# Altium PCB HALL_CURRENT_SENSE_LEM_55P.PcbDoc
Units mil, origin at the board's own origin, x right, y up, seen from the top; angles counter-clockwise.
Board outline 3937.01 x 3937.01 mil, 2 copper layers (Top Layer, Bottom Layer); 42 components, 22 nets, 124 pads, 104 vias.
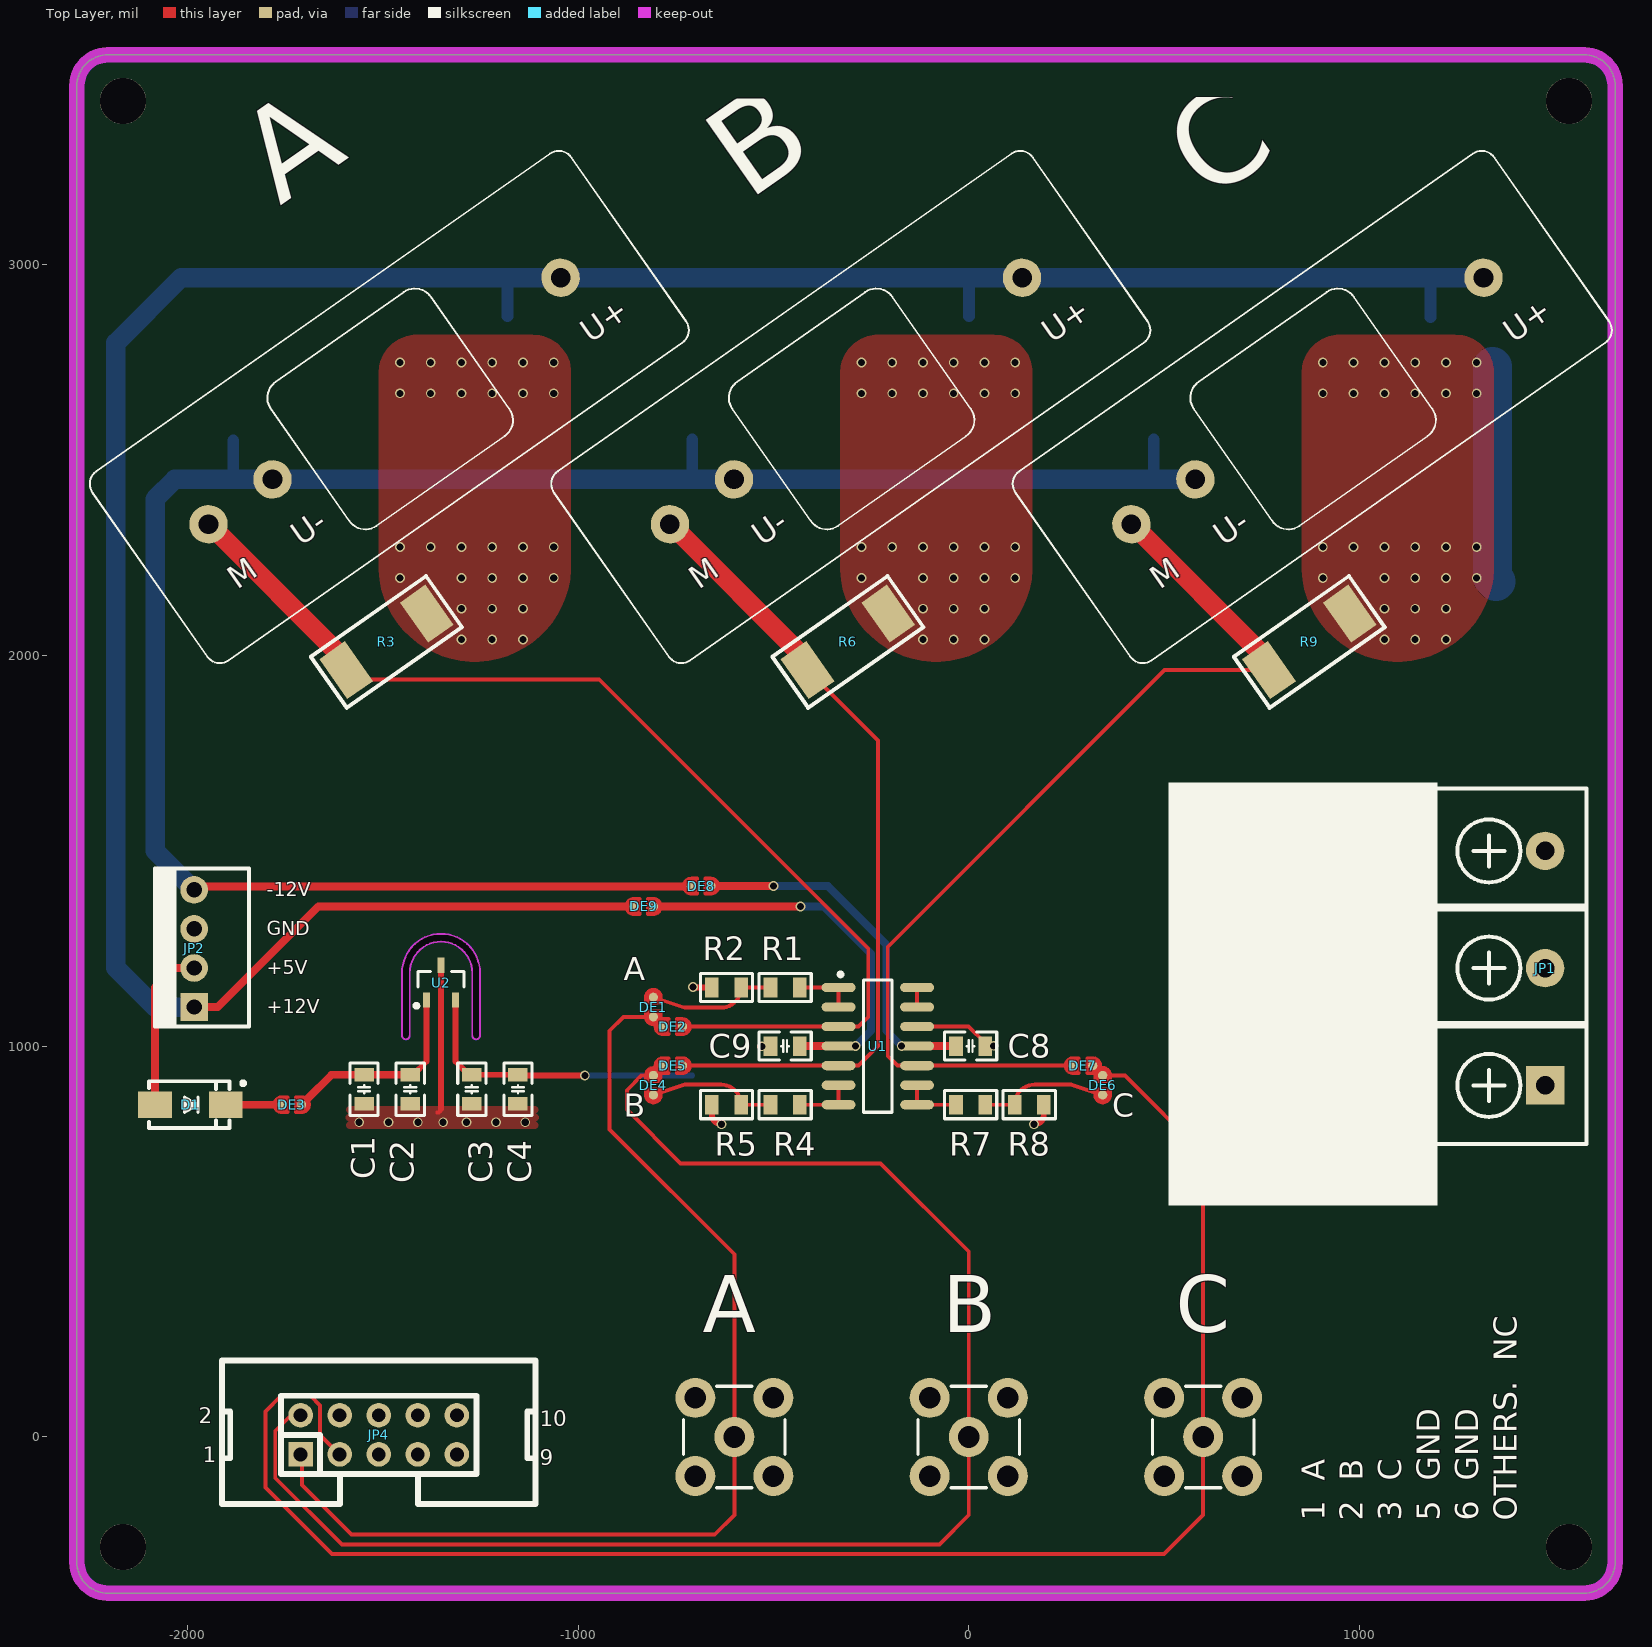
[diagram p0: Top Layer view]
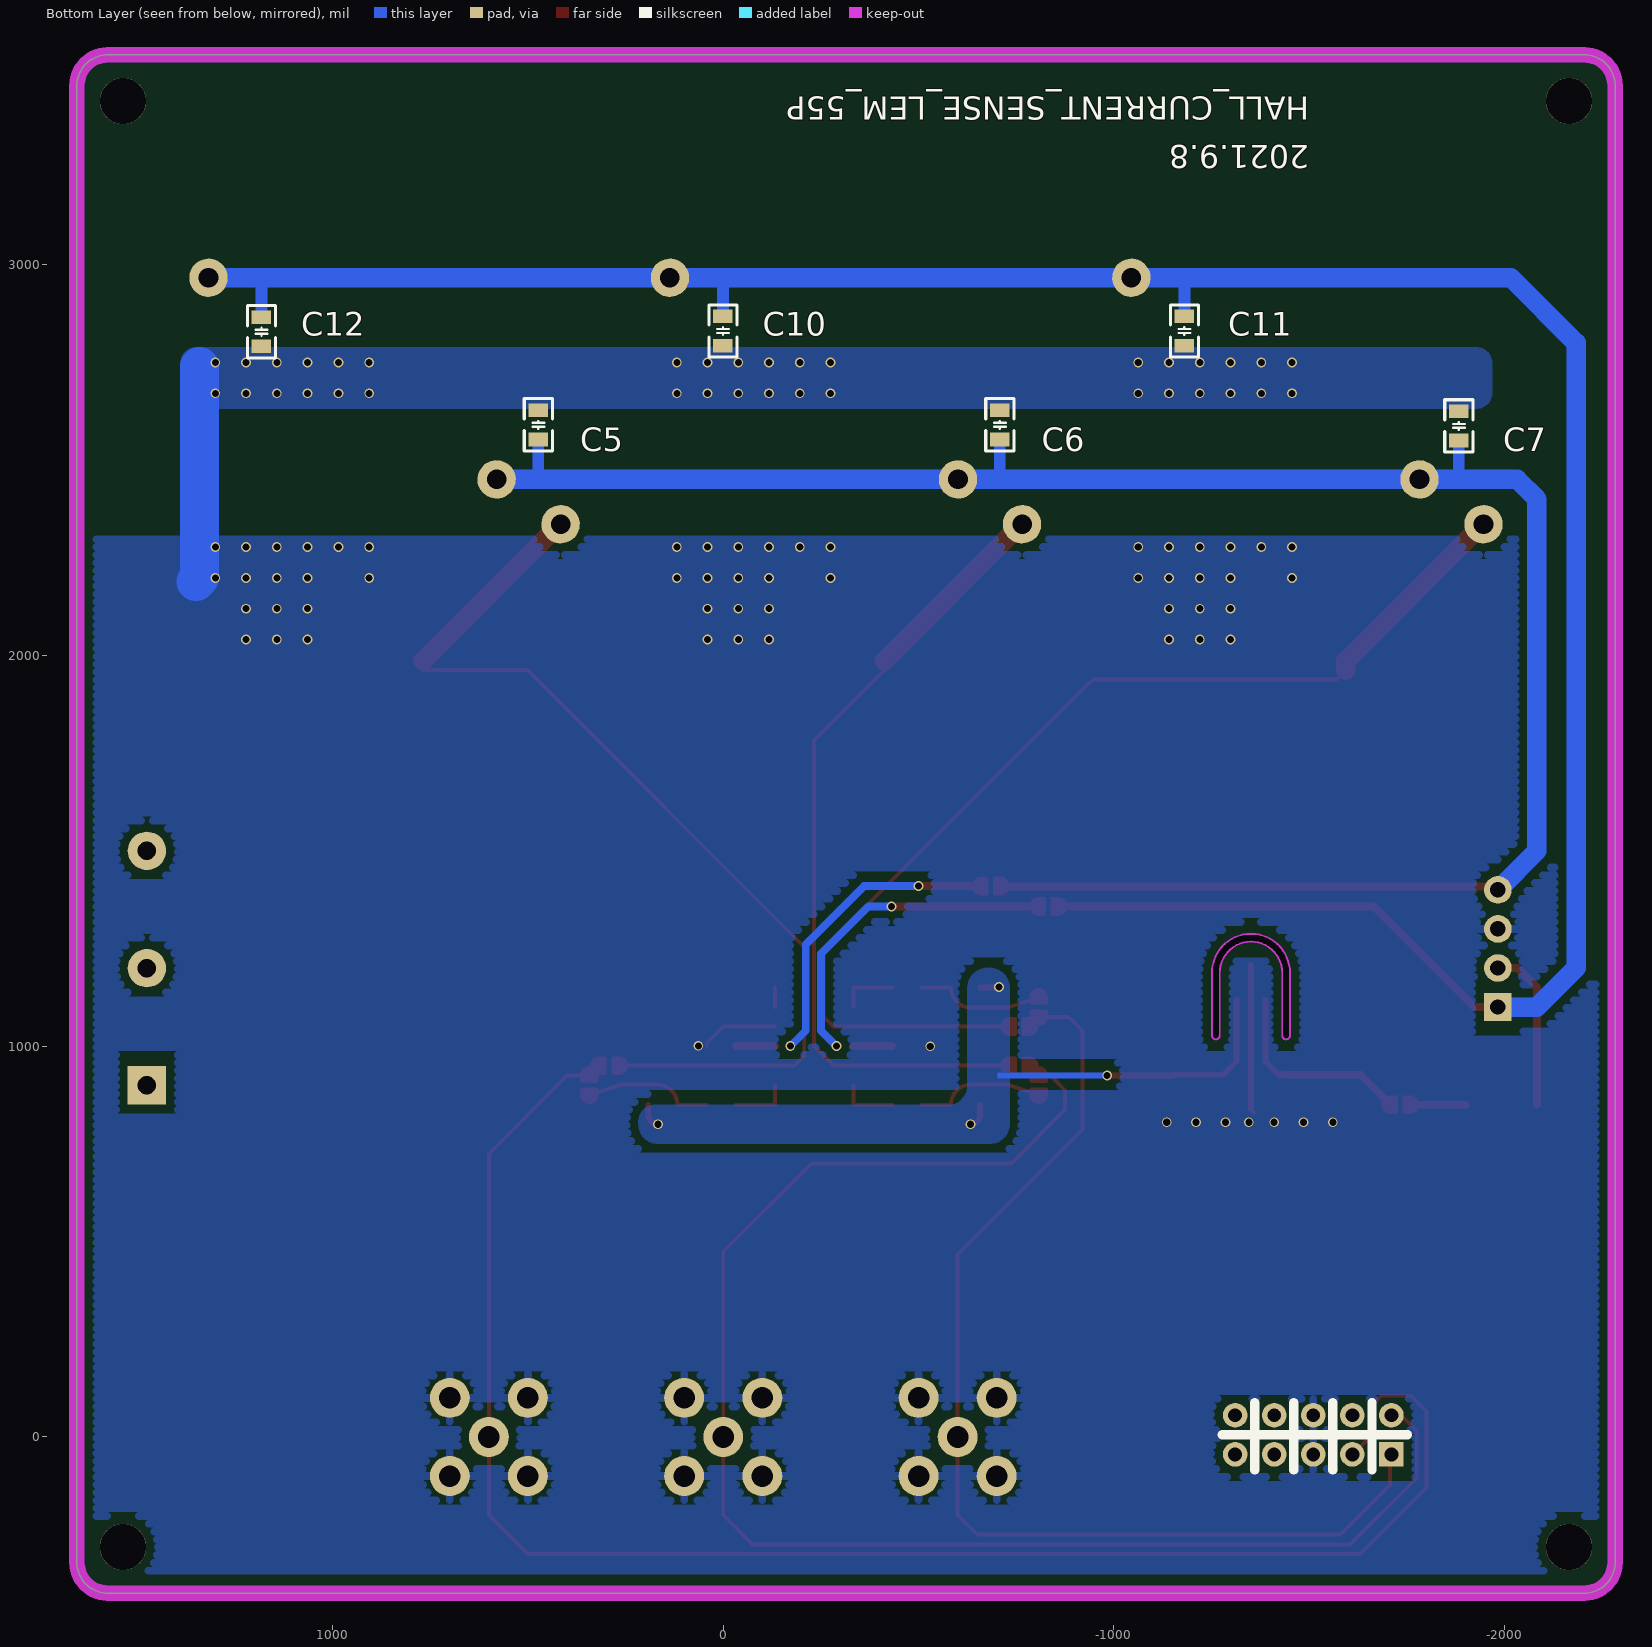
[diagram p1: Bottom Layer view, seen from below]

## Layer stack, top to bottom
Top Solder: solder mask 0.4, Solder Resist, Dk 3.5
Top Layer: signal copper 1.4
Dielectric 1: dielectric 12.6, FR-4, Dk 4.8
Bottom Layer: signal copper 1.4
Bottom Solder: solder mask 0.4, Solder Resist, Dk 3.5

## Board outline
-2282.68,-320.87 -2282.68,3458.66 cw(c-2203.94,3458.66) -2203.94,3537.4 1575.59,3537.4 cw(c1575.59,3458.66) 1654.33,3458.66 1654.33,-320.87 cw(c1575.59,-320.87) 1575.59,-399.61 -2203.94,-399.61 cw(c-2203.94,-320.87)
cut-out: -1440.71,1017.8 cw(c-1440.71,1027.8) -1450.71,1027.8 -1450.71,1187.8 cw(c-1350.71,1187.8) -1350.71,1287.8 cw(c-1350.71,1187.8) -1250.71,1187.8 -1250.71,1027.8 cw(c-1260.71,1027.8) -1260.71,1017.8 cw(c-1260.71,1027.8) -1270.71,1027.8 -1270.71,1187.8 ccw(c-1350.71,1187.8) -1350.71,1267.8 ccw(c-1350.71,1187.8) -1430.71,1187.8 -1430.71,1027.8 cw(c-1440.71,1027.8)

## Design rules (kind name [scope] priority, off if disabled: settings)
Clearance [All] p1: gap=20 ignorepadtopadclearanceinfootprint=FALSE except(0: Arc-Hole Track-Hole SMDPad-Hole THPad-Hole Via-Hole Text-Hole; 10: Arc-Arc Arc-Track Arc-SMDPad Arc-THPad Arc-Via Arc-Text Track-Track Track-SMDPad Track-THPad Track-Via Track-Text SMDPad-SMDPad SMDPad-THPad SMDPad-Via SMDPad-Text THPad-THPad THPad-Via THPad-Text Via-Via Via-Text Text-Text)
MinimumSolderMaskSliver [All] p1 off: minsoldermaskwidth=10
PolygonConnect [All] p1: thpad.connectstyle=Relief thpad.reliefconductorwidth=20 thpad.reliefentries=4 thpad.polygonreliefangle="90 Angle" thpad.airgapwidth=10 smdpad.connectstyle=Direct smdpad.reliefconductorwidth=10 smdpad.reliefentries=4 smdpad.polygonreliefangle="90 Angle" smdpad.airgapwidth=10 via.connectstyle=Direct via.reliefconductorwidth=10 via.reliefentries=4 via.polygonreliefangle="90 Angle" via.airgapwidth=10
RoutingVias [All] p1: holewidth=28 width=50 viastyle="Through Hole" minholewidth=28 minwidth=50 maxholewidth=28 maxwidth=50
SilkToSolderMaskClearance [IsPad] p1 off: minsilkscreentomaskgap=10 clearancetoexposedcopper=TRUE
SolderMaskExpansion [All] p1: expansion=4 istentingtop=FALSE
Width [All] p1: maxlimit=100 minlimit=8 preferedwidth=10
28 further rules are at their usual default settings.

## Classes and differential pairs
component class HALL_CURRENT_SENSE_LEM_55P: A B C C1 C2 C3 C4 C5 C6 C7 C8 C9 C10 C11 C12 D1 DE1 DE2 DE3 DE4 DE5 DE6 DE7 DE8 DE9 JP1 JP2 JP4 R1 R2 R3 R4 R5 R6 R7 R8 R9 U1 U2

## Components (designator, comment, footprint, x,y, rotation, side; value= is the part's Value field where it differs from the comment)
A "SMA WIFI 天线接口" SMA-KE-LI -600,0 r180 top (schematic designator JP1)
A "LA 55-P" "LA 55-P" -1495.28,2651.57 r35 top (schematic designator HALL1)
B "SMA WIFI 天线接口" SMA-KE-LI 0,0 r180 top (schematic designator JP3)
B "LA 55-P" "LA 55-P" -314.17,2651.57 r35 top (schematic designator HALL2)
C "SMA WIFI 天线接口" SMA-KE-LI 600,0 r180 top (schematic designator JP5)
C "LA 55-P" "LA 55-P" 866.93,2651.57 r35 top (schematic designator HALL3)
C1 "475" "C 0805_L" -1429.45,889.89 r90 top
C2 "104" "C 0805_L" -1547.56,889.89 r90 top
C3 "475" "C 0805_L" -1271.97,889.89 r90 top
C4 "104" "C 0805_L" -1153.86,889.89 r90 top
C5 "475" "C 0805_L" 473.23,2590.55 r270 bottom
C6 "475" "C 0805_L" -707.88,2590.55 r270 bottom
C7 "475" "C 0805_L" -1882.68,2587.79 r270 bottom
C8 "104" "C 0805_L" 4.72,1000.39 r180 top
C9 "104" "C 0805_L" -470.08,1000.4 r0 top
C10 "475" "C 0805_L" 0.79,2830.71 r90 bottom
C11 "475" "C 0805_L" -1180.31,2830.71 r90 bottom
C12 "475" "C 0805_L" 1181.89,2828.74 r90 bottom
D1 "SS34" SMA -1992.13,850.39 r0 top
DE1 "DEBUG PAD" DEBUG_B#1 -807.2,1100.39 r90 top
DE2 "DEBUG PAD" DEBUG_B#2 -757.68,1050.39 r180 top
DE3 "DEBUG PAD" DEBUG_B#3 -1732.68,850.39 r0 top
DE4 "DEBUG PAD" DEBUG_B#4 -807.2,900.39 r270 top
DE5 "DEBUG PAD" DEBUG_B#5 -757.68,950.39 r180 top
DE6 "DEBUG PAD" DEBUG_B#6 342.8,900.39 r270 top
DE7 "DEBUG PAD" DEBUG_B#5 292.32,950.39 r0 top
DE8 "DEBUG PAD" DEBUG_B#3 -685,1410 r0 top
DE9 "DEBUG PAD" DEBUG_B#3 -832.2,1357.8 r0 top
JP1 "HDR-1X3" KF7620-3P 1331.3,1200 r90 top
JP2 "HDR-1X4" KF2510-LI-4P -1982.68,1250.39 r90 top
JP4 "Header 5X2" IDC2.54-LI-2x5P -1710.16,-44.49 r0 top
R1 "10K" "R 0805_L" -470.08,1150.4 r0 top
R2 "10K" "R 0805_L" -620.08,1150.4 r0 top
R3 "100" "R 2512_M" -1490.5,2034.85 r35 top
R4 "10K" "R 0805_L" -470.08,850.4 r0 top
R5 "10K" "R 0805_L" -620.08,850.4 r0 top
R6 "100" "R 2512_M" -309.4,2034.85 r35 top
R7 "10K" "R 0805_L" 4.72,850.39 r180 top
R8 "10K" "R 0805_L" 154.72,850.39 r180 top
R9 "100" "R 2512_M" 871.7,2034.85 r35 top
U1 "LM324" SOIC-14 -232.68,1000.39 r0 top
U2 "REF3030" SOT23-3L -1350.71,1163.5 r0 top

## Footprints (in the part's own frame and the unit in brackets; to place one, negate y for a bottom-side part, rotate by r counter-clockwise, add the part's x,y. Pads: shape width x height; smd on the part's side, far side on the other; paste and mask are expansions set on the pad)
"C 0805_L" [mil] "无极性贴片电容"
  rect 35x50 smd: 1(-37.4,0) 2(37.4,0)
  silkscreen extent -67,-36 67,36, body extent -39,-24 39,24, height 20
DEBUG_B#1 [mm] "调试断点焊盘"
  round 0.6 smd paste-0.6: 1(-0.635,0) 2(0.635,0)
  Top Layer region: 0.254,-0.508 0.762,-0.508 0.908,-0.479 1.031,-0.396 1.114,-0.273 1.143,-0.127 1.143,-0.127 1.143,0 1.104,0.194 0.994,0.359 0.829,0.469 0.635,0.508 0.635,0.508 0.254,0.508
  Top Layer region: -0.254,0.508 -0.762,0.508 -0.908,0.479 -1.031,0.396 -1.114,0.273 -1.143,0.127 -1.143,0.127 -1.143,0 -1.104,-0.194 -0.994,-0.359 -0.829,-0.469 -0.635,-0.508 -0.635,-0.508 -0.254,-0.508
  Top Layer lines w0.203: -0.635,0.508 ccw(c-0.635,0) -1.124,-0.136 ccw(c-0.635,0) -0.781,-0.487 ccw(c-0.635,0) -0.635,-0.508 -0.254,-0.508 -0.254,0.508 -0.635,0.508 ; 0.254,0.508 0.254,-0.508 0.635,-0.508 ccw(c0.635,0) 0.635,0.508 0.254,0.508
DEBUG_B#2 [mm] "调试断点焊盘"
  round 0.6 smd paste-0.6: 1(-0.635,0) 2(0.635,0)
  Top Layer region: 0.254,-0.508 0.762,-0.508 0.908,-0.479 1.031,-0.396 1.114,-0.273 1.143,-0.127 1.143,-0.127 1.143,0 1.104,0.194 0.994,0.359 0.829,0.469 0.635,0.508 0.635,0.508 0.254,0.508
  Top Layer region: -0.254,0.508 -0.762,0.508 -0.908,0.479 -1.031,0.396 -1.114,0.273 -1.143,0.127 -1.143,0.127 -1.143,0 -1.104,-0.194 -0.994,-0.359 -0.829,-0.469 -0.635,-0.508 -0.635,-0.508 -0.254,-0.508
  Top Layer lines w0.203: 1.122,-0.146 ccw(c0.635,0) 0.635,0.508 0.254,0.508 0.254,-0.508 0.635,-0.508 ccw(c0.635,0) 0.771,-0.489 ccw(c0.635,0) 1.122,-0.146 ; -0.254,0.508 -0.635,0.508 ccw(c-0.635,0) -1.143,0 ccw(c-0.635,0) -0.635,-0.508 -0.254,-0.508 -0.254,0.508
DEBUG_B#3 [mm] "调试断点焊盘"
  round 0.6 smd paste-0.6: 1(-0.635,0) 2(0.635,0)
  Top Layer region: 0.254,-0.508 0.762,-0.508 0.908,-0.479 1.031,-0.396 1.114,-0.273 1.143,-0.127 1.143,-0.127 1.143,0 1.104,0.194 0.994,0.359 0.829,0.469 0.635,0.508 0.635,0.508 0.254,0.508
  Top Layer region: -0.254,0.508 -0.762,0.508 -0.908,0.479 -1.031,0.396 -1.114,0.273 -1.143,0.127 -1.143,0.127 -1.143,0 -1.104,-0.194 -0.994,-0.359 -0.829,-0.469 -0.635,-0.508 -0.635,-0.508 -0.254,-0.508
  Top Layer lines w0.203: -1.143,0 ccw(c-0.635,0) -0.635,-0.508 -0.254,-0.508 -0.254,0 -0.254,0.508 -0.635,0.508 ccw(c-0.635,0) -1.143,0 ; 0.254,-0.508 0.254,0 0.254,0.508 0.635,0.508 cw(c0.635,0) 0.994,0.359 cw(c0.635,0) 0.635,-0.508 0.254,-0.508
DEBUG_B#4 [mm] "调试断点焊盘"
  round 0.6 smd paste-0.6: 1(-0.635,0) 2(0.635,0)
  Top Layer region: 0.254,-0.508 0.762,-0.508 0.908,-0.479 1.031,-0.396 1.114,-0.273 1.143,-0.127 1.143,-0.127 1.143,0 1.104,0.194 0.994,0.359 0.829,0.469 0.635,0.508 0.635,0.508 0.254,0.508
  Top Layer region: -0.254,0.508 -0.762,0.508 -0.908,0.479 -1.031,0.396 -1.114,0.273 -1.143,0.127 -1.143,0.127 -1.143,0 -1.104,-0.194 -0.994,-0.359 -0.829,-0.469 -0.635,-0.508 -0.635,-0.508 -0.254,-0.508
  Top Layer lines w0.203: 0.635,-0.508 ccw(c0.635,0) 0.635,0.508 0.254,0.508 0.254,-0.508 0.635,-0.508 ; -0.254,-0.508 -0.254,0 -0.254,0.508 -0.635,0.508 ccw(c-0.635,0) -0.781,0.487 ccw(c-0.635,0) -1.124,0.136 ccw(c-0.635,0) -0.635,-0.508 -0.254,-0.508
DEBUG_B#5 [mm] "调试断点焊盘"
  round 0.6 smd paste-0.6: 1(-0.635,0) 2(0.635,0)
  Top Layer region: 0.254,-0.508 0.762,-0.508 0.908,-0.479 1.031,-0.396 1.114,-0.273 1.143,-0.127 1.143,-0.127 1.143,0 1.104,0.194 0.994,0.359 0.829,0.469 0.635,0.508 0.635,0.508 0.254,0.508
  Top Layer region: -0.254,0.508 -0.762,0.508 -0.908,0.479 -1.031,0.396 -1.114,0.273 -1.143,0.127 -1.143,0.127 -1.143,0 -1.104,-0.194 -0.994,-0.359 -0.829,-0.469 -0.635,-0.508 -0.635,-0.508 -0.254,-0.508
  Top Layer lines w0.203: 1.122,0.146 ccw(c0.635,0) 0.771,0.489 ccw(c0.635,0) 0.635,0.508 0.254,0.508 0.254,0 0.254,-0.508 0.635,-0.508 ccw(c0.635,0) 1.122,0.146 ; -0.254,0.508 -0.635,0.508 ccw(c-0.635,0) -1.143,0 ccw(c-0.635,0) -0.635,-0.508 -0.254,-0.508 -0.254,0.508
DEBUG_B#6 [mm] "调试断点焊盘"
  round 0.6 smd paste-0.6: 1(-0.635,0) 2(0.635,0)
  Top Layer region: 0.254,-0.508 0.762,-0.508 0.908,-0.479 1.031,-0.396 1.114,-0.273 1.143,-0.127 1.143,-0.127 1.143,0 1.104,0.194 0.994,0.359 0.829,0.469 0.635,0.508 0.635,0.508 0.254,0.508
  Top Layer region: -0.254,0.508 -0.762,0.508 -0.908,0.479 -1.031,0.396 -1.114,0.273 -1.143,0.127 -1.143,0.127 -1.143,0 -1.104,-0.194 -0.994,-0.359 -0.829,-0.469 -0.635,-0.508 -0.635,-0.508 -0.254,-0.508
  Top Layer lines w0.203: 0.635,-0.508 ccw(c0.635,0) 0.635,0.508 0.254,0.508 0.254,0 0.254,-0.508 0.469,-0.508 0.635,-0.508 ; -0.254,-0.508 -0.254,0 -0.254,0.508 -0.635,0.508 ccw(c-0.635,0) -1.116,-0.163 ccw(c-0.635,0) -0.789,-0.484 ccw(c-0.635,0) -0.635,-0.508 -0.254,-0.508
IDC2.54-LI-2x5P [mm] "10P简易牛角座"
  rect 1.6x1.6 hole 0.9: 1(0,0)
  round 1.6 hole 0.9: 2(0,2.54) 3(2.54,0) 4(2.54,2.54) 5(5.08,0) 6(5.08,2.54) 7(7.62,0) 8(7.62,2.54) 9(10.16,0) 10(10.16,2.54)
  silkscreen extent -5.11,-3.23 15.27,6.1, body extent -5.08,-3.08 15.24,5.77, height 9.17
KF2510-LI-4P [mm] "接插件/2A"
  rect 1.8x1.8 hole 1: 1(-3.81,0)
  round 1.8 hole 1: 2(-1.27,0) 3(1.27,0) 4(3.81,0)
  silkscreen extent -5.08,-3.56 5.21,2.54, body extent -5.08,-3.5 5.08,2.4, height 11.05
KF7620-3P [mm] "22.8*12*12mm(长宽高)"
  rect 2.5x2.5 hole 1.2: 1(-7.62,-3.65)
  round 2.5 hole 1.2: 2(0,-3.65) 3(7.62,-3.65)
  silkscreen extent -11.43,-6.35 11.68,6.35, body extent -11.43,-6.2 12.13,6.2, height 12.45
"LA 55-P" [mm] "LEM 莱姆闭环霍尔电流传感器"
  round 2.5 hole 1.27: 1(-13.97,0) 2(-8.89,0) 3(13.97,0)
  silkscreen extent -18.97,-8 19.03,7
"R 0805_L" [mil] "1/8W贴片电阻   https://item.taobao.com/item.htm?ft=t&id=613637044352"
  rect 35x50 smd: 1(-37.4,0) 2(37.4,0)
  silkscreen extent -67,-36 67,36, body extent -39,-25 39,25, height 20
"R 2512_M" [mm] "1W贴片电阻"
  rect 2.032x3.2 smd: 1(-3.2,0) 2(3.2,0)
  silkscreen extent -4.57,-2.03 4.57,2.03, body extent -3.2,-1.6 3.2,1.6, height 0.55
SMA [mm] "4.5x2.6*2.2mm（长宽高，不包括引脚）"
  rect 2.2x1.75 smd: 1(-2.3,0) 2(2.3,0)
  silkscreen extent -2.7,-1.52 3.56,1.52, body extent -2.53,-1.3 2.58,1.3, height 2.15
SMA-KE-LI [mm] "SMA 立式直插射频天线座"
  round 2.6 hole 1.4: 1(0,0) 2(-2.54,-2.54) 2(2.54,-2.54) 3(-2.54,2.54) 3(2.54,2.54)
  silkscreen extent -3.3,-3.3 3.3,3.3, body extent -3.25,-3.25 3.25,3.25, height 10.35
SOIC-14 [mm] "SOP, 14-Leads,"
  oval 2.2x0.6 smd: 1(-2.552,3.81) 2(-2.552,2.54) 3(-2.552,1.27) 4(-2.552,0) 5(-2.552,-1.27) 6(-2.552,-2.54) 7(-2.552,-3.81) 8(2.552,-3.81) 9(2.552,-2.54) 10(2.552,-1.27) 11(2.552,0) 12(2.552,1.27) 13(2.552,2.54) 14(2.552,3.81)
  silkscreen extent -2.55,-4.3 0.93,4.78, body extent -3,-4.35 2.99,4.35, height 1.55
SOT23-3L [mm] "3x1.3x1mm(长宽高)"
  rect 0.45x1 smd: 1(-0.95,-1.143) 2(0.95,-1.143) 3(0,1.125)
  silkscreen extent -1.72,-1.65 1.5,0.7, body extent -1.5,-1.2 1.5,1.2, height 1.05

## Part data
A B C: library part "SMA WIFI", "SMA-2.4G射频天线接口", BOM名称=SMA-2.4G射频天线接口, 下单链接=https://item.taobao.com/item.htm?ft=t&id=613637044352, 淘宝ID=小糖豆的小窝窝
A B C: "LEM 莱姆闭环霍尔电流传感器"
C1 C2 C3 C4 C5 C6 C7 C8 C9 C10 C11 C12: library part C, "贴片电容", BOM名称=贴片电容, 下单链接=https://item.taobao.com/item.htm?ft=t&id=613637044352, 淘宝ID=小糖豆的小窝窝
D1: library part 1N4007, "整流二极管", BOM名称=整流二极管, 下单链接=https://item.taobao.com/item.htm?ft=t&id=613637044352, 淘宝ID=小糖豆的小窝窝
DE1 DE2 DE3 DE4 DE5 DE6 DE7 DE8 DE9: library part DEBUG, "调试断点焊盘", BOM名称=调试断点焊盘, 下单链接=https://item.taobao.com/item.htm?ft=t&id=613637044352, 淘宝ID=小糖豆的小窝窝
JP1: library part "Header 3", "3P接插件", BOM名称=3P接插件, 下单链接=https://item.taobao.com/item.htm?ft=t&id=613637044352, 淘宝ID=小糖豆的小窝窝
JP2: library part "Header 4", "4P接插件", BOM名称=4P接插件, 下单链接=https://item.taobao.com/item.htm?ft=t&id=613637044352, 淘宝ID=小糖豆的小窝窝
JP4: "5*2P接插件", BOM名称=5*2P接插件, 下单链接=https://item.taobao.com/item.htm?ft=t&id=613637044352, 淘宝ID=小糖豆的小窝窝
R1 R2 R3 R4 R5 R6 R7 R8 R9: library part R, "贴片电阻", BOM名称=贴片电阻, 下单链接=https://item.taobao.com/item.htm?ft=t&id=613637044352, 淘宝ID=小糖豆的小窝窝
U1: "4路运放", Alias1=https://item.taobao.com/item.htm?ft=t&id=613637044352, BOM名称=4路运放, 淘宝ID=小糖豆的小窝窝

## Free pads (board coordinates)
  round 118.11 hole 118.11: Q(-2164.57,-281.5) Q(-2164.57,3419.29) Q(1536.22,-281.5) Q(1536.22,3419.29)

## Via types
v1: diameter 25, hole 18, Top Layer to Bottom Layer, 104 vias

## Nets (pads, with @x,y where several pads share a name; then routed paths per layer and width w, separated by ;. In a path a pad name is that pad's centre, name@x,y a point inside that pad or via, vN(x,y) a via of type N, cw(c..) or ccw(c..) an arc to the next point about the centre after c; other vN are vias at no path point)
+5: D1.1 JP2.2 | length 420.7
  Top Layer w20: D1.1 -2082.68,1150.39 -2032.68,1200.39 JP2.2
+12: A.3@-1044.74,2967.04 B.3@136.36,2967.04 C10.2 C11.2 C12.2 C.3@1317.46,2967.04 DE9.1 JP2.1 | length 6942.7
  Top Layer w20: JP2.1 -1921.97,1100.39 -1664.57,1357.8 -877.2,1357.8 DE9.1
  Bottom Layer w30: C11.2 -1180.32,2966.73 -1180,2967.04 ; 0,2967.04 0.79,2966.25 C10.2 ; 1180,2967.04 1181.89,2965.16 C12.2
  Bottom Layer w50: JP2.1 -2082.68,1100.39 -2182.68,1200.39 -2182.68,2800.39 -2016.03,2967.04 -1180,2967.04 -1044.74,2967.04 0,2967.04 136.36,2967.04 1180,2967.04 C.3@1317.46,2967.04
-12: A.2@-1781.98,2450.82 B.2@-600.88,2450.82 C5.2 C6.2 C7.2 C.2@580.23,2450.82 DE8.1 JP2.4 | length 5331.9
  Top Layer w20: JP2.4@-1972.68,1397.8 -1976.38,1394.09 JP2.4 -1973.76,1409.31 -729.99,1409.31 -710.69,1409.31 DE8.1
  Bottom Layer w20: JP2.4 JP2.4@-1978.6,1400.39
  Bottom Layer w30: -1890,2450.82 -1882.68,2458.15 C7.2 ; C6.2 -707.87,2458.7 -700,2450.82 ; 470,2450.82 473.23,2454.05 C5.2
  Bottom Layer w50: JP2.4 -2082.68,1500.39 -2082.68,2400.39 -2032.25,2450.82 -1890,2450.82 -1781.98,2450.82 -700,2450.82 -600.88,2450.82 470,2450.82 C.2@580.23,2450.82
GND: A.2@-500,100 A.2@-700,100 A.3@-500,-100 A.3@-700,-100 B.2@100,100 B.2@-100,100 B.3@100,-100 B.3@-100,-100 C1.1 C2.1 C3.1 C4.1 C5.1 C6.1 C7.1 C8.1 C9.1 C10.1 C11.1 C12.1 C.2@500,100 C.2@700,100 C.3@500,-100 C.3@700,-100 JP2.3 JP4.5 JP4.6 R3.2 R6.2 R9.2 U1.12 U2.3 | length 1136.3
  Top Layer w10: -1360.16,830.51 ccw(c-1360.16,839.96) -1350.71,839.96 ; U1.12 -0.37,1050.39 42.13,1007.89 C8.1
  Top Layer w15: -1350.71,839.96 U2.3
  Bottom Layer w100: 1340,2740 1340,2200 1350,2190
  other v1: -1560.16,805.51 -1485.16,805.51 -1410.16,805.51 -1345.16,805.51 -1285.16,805.51 -1210.16,805.51 -1135.16,805.51 -529.81,1000 63.75,1001.07 -1298.43,2041.34 -1219.68,2041.34 -1140.94,2041.34 -117.32,2041.34 -38.58,2041.34 40.16,2041.34 1063.78,2041.34 1142.52,2041.34 1221.26,2041.34 -1298.43,2120.08 -1219.68,2120.08 -1140.94,2120.08 -117.32,2120.08 -38.58,2120.08 40.16,2120.08 1063.78,2120.08 1142.52,2120.08 1221.26,2120.08 -1455.91,2198.82 -1298.43,2198.82 -1219.68,2198.82 -1140.94,2198.82 -1062.2,2198.82 -274.8,2198.82 -117.32,2198.82 -38.58,2198.82 40.16,2198.82 118.9,2198.82 906.3,2198.82 1063.78,2198.82 1142.52,2198.82 1221.26,2198.82 1300,2198.82 -1455.91,2277.56 -1377.17,2277.56 -1298.43,2277.56 -1219.68,2277.56 -1140.94,2277.56 -1062.2,2277.56 -274.8,2277.56 -196.06,2277.56 -117.32,2277.56 -38.58,2277.56 40.16,2277.56 118.9,2277.56 906.3,2277.56 985.04,2277.56 1063.78,2277.56 1142.52,2277.56 1221.26,2277.56 1300,2277.56 -1455.91,2671.26 -1377.17,2671.26 -1298.43,2671.26 -1219.69,2671.26 -1140.94,2671.26 -1062.2,2671.26 -274.8,2671.26 -196.06,2671.26 -117.32,2671.26 -38.58,2671.26 40.16,2671.26 118.9,2671.26 906.3,2671.26 985.04,2671.26 1063.78,2671.26 1142.52,2671.26 1221.26,2671.26 1300,2671.26 -1455.91,2750 -1377.17,2750 -1298.43,2750 -1219.69,2750 -1140.94,2750 -1062.2,2750 -274.8,2750 -196.06,2750 -117.32,2750 -38.58,2750 40.16,2750 118.9,2750 906.3,2750 985.04,2750 1063.78,2750 1142.52,2750 1221.26,2750 1300,2750
IA: A.1@-600,0 DE1.1 DE2.2 JP4.1 | length 2759.2
  Top Layer w10: JP4.1 -1707.01,-47.64 -1707.01,-122.64 -1579.65,-250 -650,-250 -600,-200 -600,0 -600,467.72 -919.61,787.32 -919.61,1039.76 -883.98,1075.39 -827.2,1075.39 DE1.1
IB: B.1@0,0 DE4.1 DE5.2 JP4.2 | length 3911.8
  Top Layer w10: JP4.2 -1735.16,55.51 -1775,15.67 -1775,-104.65 -1604.65,-275 -75,-275 0,-200 0,0 0,475 -225.39,700.39 -737.72,700.39 -875,837.68 -875,887.52 -837.13,925.39 -827.2,925.39 DE4.1
IC: C.1@600,0 DE6.1 DE7.2 JP4.3 | length 4284.9
  Top Layer w10: JP4.3 -1660.16,5.51 -1660.16,80.51 -1685.16,105.51 -1760.16,105.51 -1800,65.67 -1800,-129.65 -1629.65,-300 500,-300 600,-200 600,0 600,725 399.61,925.39 362.8,925.39 DE6.1
NetA_1: A.1@-1945.81,2336.11 DE2.1 R3.1 U1.3 | length 2813.1
  Top Layer w10: R3.1 -1570.04,1938.94 -945.75,1938.94 -257.2,1250.39 -257.2,1075.39 -282.2,1050.39 U1.3 -712.68,1050.39 DE2.1
  Top Layer w50: A.1@-1945.81,2336.11 -1943.39,2336.11 -1593.7,1986.42 R3.1
NetB_1: B.1@-764.71,2336.11 DE5.1 R6.1 U1.5 | length 2052.6
  Top Layer w10: DE5.1 -712.68,950.39 U1.5 -282.2,950.39 -232.2,1000.39 -232.2,1782.2 R6.1
  Top Layer w50: B.1@-762.29,2336.11 R6.1@-412.6,1986.42
NetC1_2: C1.2 C2.2 DE3.2 U2.1 | length 522.8
  Top Layer w15: C1.2@-1421.95,927.28 -1388.11,961.12 U2.1
  Top Layer w16: C1.2 C1.2@-1421.95,927.28
  Top Layer w20: DE3.2 -1693.54,864.54 -1630.79,927.28 C2.2 C1.2
NetC8_2: C8.2 DE8.2 U1.11 | length 886.9
  Top Layer w20: DE8.2 -640,1410 v1(-500,1410) ; U1.11 C8.2
  Bottom Layer w20: v1(-500,1410) -360.55,1410 -210.94,1260.39 -210.94,1039.76 v1(-171.57,1000.39)
NetC9_2: C9.2 DE9.2 U1.4 | length 959.1
  Top Layer w20: DE9.2 -799.16,1357.8 v1(-430.71,1357.8) ; C9.2 U1.4
  Bottom Layer w20: v1(-430.71,1357.8) -371.5,1357.8 -250.31,1236.61 -250.31,1039.76 v1(-289.68,1000.39)
NetC_1: C.1@416.4,2336.11 DE7.1 R9.1 U1.10 | length 2527.6
  Top Layer w10: DE7.1 247.32,950.39 U1.10 -182.2,950.39 -207.2,975.39 -207.2,1254.54 500.86,1962.6 R9.1
  Top Layer w50: C.1@418.81,2336.11 R9.1@768.5,1986.42
NetD1_2: D1.2 DE3.1 | length 143.9
  Top Layer w20: D1.2 -1777.68,850.39 DE3.1
NetDE1_2: DE1.2 R1.1 R2.2 | length 313.3
  Top Layer w10: -788.15,1118.86 -726.85,1098.82 -634.25,1098.82 ccw(c-634.25,1150.39) R2.2 R1.1
NetDE4_2: DE4.2 R4.1 R5.2 | length 313.3
  Top Layer w10: -788.15,881.93 -726.85,901.97 -634.25,901.97 cw(c-634.25,850.39) R5.2 R4.1
NetDE6_2: DE6.2 R7.1 R8.2 | length 334.3
  Top Layer w10: R7.1 R8.2 cw(c168.9,850.39) 168.9,901.97 261.5,901.97 322.8,881.93 DE6.2
NetR1_2: R1.2 U1.1 U1.2 | length 149.5
  Top Layer w10: R1.2 U1.1 U1.2
NetR4_2: R4.2 U1.6 U1.7 | length 149.5
  Top Layer w10: R4.2 U1.7 U1.6
NetR7_2: R7.2 U1.8 U1.9 | length 149.5
  Top Layer w10: U1.9 U1.8 R7.2
NetU1_13: U1.13 U1.14 | length 50
  Top Layer w10: U1.13 U1.14
Vref: C3.2 C4.2 R2.1 R5.1 R8.1 U2.2 | length 955
  Top Layer w15: U2.2 -1313.31,961.12 -1279.47,927.28 C3.2 C4.2 -1151.97,925.39 v1(-982.68,925.39) ; v1(-705.5,1151.83) ccw(c-704.07,1151.83) -704.07,1150.39 R2.1 ; R5.1 -657.48,825.2 ccw(c-632.68,825.2) v1(-632.68,800.39) ; v1(167.32,800.39) ccw(c167.32,825.2) 192.13,825.2 R8.1
  Bottom Layer w15: v1(-982.68,925.39) -707.68,925.39
pads on no net: JP1.1 JP1.2 JP1.3 JP4.4 JP4.7 JP4.8 JP4.9 JP4.10

## Polygon pours and split planes (outlines as drawn)
GND on Bottom Layer "NONET_L02_P-001" (hatched Horizontal grid 20 track 20, remove dead copper, pour order 18): 1949.29,2307.8 1949.29,-1192.2 1849.29,-1092.2 -2850.71,-1092.2 -2850.71,2107.8 -2650.71,2307.8
GND on Bottom Layer "Bottom Layer-GND" (solid, remove dead copper, pour order 15): -1849.62,2631.89 ccw(c-1849.61,2671.26) -1849.61,2631.89 -1800.41,2631.89 ccw(c-1800.39,2671.26) -1800.39,2631.89 1349.21,2631.89 ccw(c1349.21,2671.26) 1388.58,2671.26 1388.58,2671.35 1388.58,2750 ccw(c1349.21,2750) 1349.21,2789.37 1221.26,2789.37 -1800.39,2789.37 ccw(c-1800.39,2750) -1800.48,2789.37 -1849.61,2789.37 ccw(c-1849.61,2750) -1849.69,2789.37 -1879.13,2789.37 ccw(c-1879.13,2750) -1879.22,2789.37 -1928.35,2789.37 ccw(c-1928.35,2750) -1967.72,2750 -1967.72,2671.26 ccw(c-1928.35,2671.26) -1928.35,2631.89 -1879.15,2631.89 ccw(c-1879.13,2671.26) -1879.13,2631.89
Vref on Bottom Layer "NONET_L02_P-001" (solid, remove dead copper, pour order 17): -732.68,1150.39 cw(c-682.68,1150.39) -682.68,1200.39 -675,1200.39 cw(c-675,1150.4) -625,1150.39 -625,900 ccw(c-574.76,900) -574.76,849.76 175.24,849.76 cw(c175.24,807.68) 217.32,807.68 217.32,800.39 cw(c167.33,800.39) 167.32,750.39 -682.68,750.39 cw(c-682.68,800.39) -732.68,800.39
GND on Top Layer "NONET_L02_P-001" (hatched Horizontal grid 20 track 20, remove dead copper, pour order 16): -1560.16,855.51 ccw(c-1560.16,830.51) -1585.16,830.51 -1585.16,805.51 ccw(c-1560.16,805.51) -1560.16,780.51 -1135.16,780.51 ccw(c-1135.16,805.51) -1110.16,805.51 -1110.16,830.51 ccw(c-1135.16,830.51) -1135.16,855.51
GND on Top Layer "Top Layer-GND" (solid, remove dead copper, pour order 10): 852.05,2229.97 ccw(c1097.37,2229.97) 1097.37,1984.65 ccw(c1097.37,2231.45) 1344.17,2231.45 1344.17,2722.83 ccw(c1245.75,2722.84) 1245.75,2821.26 950.61,2821.26 ccw(c950.54,2722.77) 852.05,2722.83
GND on Top Layer "Top Layer-GND 1" (solid, remove dead copper, pour order 9): -329.06,2229.97 ccw(c-83.73,2229.97) -83.73,1984.65 ccw(c-83.73,2231.45) 163.07,2231.45 163.07,2722.83 ccw(c64.65,2722.84) 64.65,2821.26 -230.49,2821.26 ccw(c-230.56,2722.77) -329.06,2722.83
GND on Top Layer "Top Layer-GND 2" (solid, remove dead copper, pour order 8): -1510.16,2229.97 ccw(c-1264.83,2229.97) -1264.83,1984.65 ccw(c-1264.83,2231.45) -1018.03,2231.45 -1018.03,2722.83 ccw(c-1116.46,2722.84) -1116.46,2821.26 -1411.59,2821.26 ccw(c-1411.66,2722.77) -1510.16,2722.83

## Keep-outs
Keep-Out Layer:
  lines w5: -1450.71,1027.8 ccw(c-1440.71,1027.8) -1440.71,1017.8 ccw(c-1440.71,1027.8) -1430.71,1027.8 -1430.71,1187.8 cw(c-1350.71,1187.8) -1350.71,1267.8 cw(c-1350.71,1187.8) -1270.71,1187.8 -1270.71,1027.8 ccw(c-1260.71,1027.8) -1260.71,1017.8 ccw(c-1260.71,1027.8) -1250.71,1027.8 -1250.71,1187.8 ccw(c-1350.71,1187.8) -1350.71,1287.8 ccw(c-1350.71,1187.8) -1450.71,1187.8 -1450.71,1027.8
  lines w40: 1654.33,3458.66 ccw(c1575.59,3458.66) 1575.59,3537.4 -2203.94,3537.4 ccw(c-2203.94,3458.66) -2282.68,3458.66 -2282.68,-320.87 ccw(c-2203.94,-320.87) -2203.94,-399.61 1575.59,-399.61 ccw(c1575.59,-320.87) 1654.33,-320.87 1654.33,3458.66 ; 1654.33,3458.66 1654.33,3458.66

## Silkscreen, mask and mechanical layers (free items; w line width, h text height)
Top Overlay:
  rectangle: 511.02,592.32 1200,1675
  text "-12V" at -1796.38,1372.65 h60
  text "GND" at -1796.38,1272.65 h60
  text "+5V" at -1796.38,1172.65 h60
  text "A" at -882.68,1150.39 h100
  text "+12V" at -1796.38,1072.65 h60
  text "B" at -882.68,800.39 h100
  text "C" at 367.32,800.39 h100
  text "1  A" at 929.72,-213.78 h100 r90
  text "2  B" at 1028.15,-213.78 h100 r90
  text "3  C" at 1126.57,-213.78 h100 r90
  text "5  GND" at 1225,-213.78 h100 r90
  text "6  GND" at 1323.43,-213.78 h100 r90
  text "OTHERS.  NC" at 1421.85,-213.78 h100 r90
Bottom Overlay:
  text "HALL_CURRENT_SENSE_LEM_55P" at -1500,3450 h100 r180
  text "2021.9.8" at -1500,3325 h100 r180
Mechanical 1:
  lines w5: -1430.71,1187.79 ccw(c-1430.71,1187.8) -1430.71,1187.8 ; -1430.71,1187.8 cw(c-1350.71,1187.8) -1350.71,1267.8 cw(c-1350.71,1187.8) -1270.71,1187.8 -1270.71,1027.8 ccw(c-1260.71,1027.8) -1260.71,1017.8 ccw(c-1260.71,1027.8) -1250.71,1027.8 -1250.71,1187.8 ccw(c-1350.71,1187.8) -1350.71,1287.8 ccw(c-1350.71,1187.8) -1450.71,1187.8 -1450.71,1027.8 ccw(c-1440.71,1027.8) -1440.71,1017.8 ccw(c-1440.71,1027.8) -1430.71,1027.8 -1430.71,1187.8 ; 1656.83,-320.87 ccw(c1654.33,-320.87) 1656.83,-320.81 ; 1656.83,-320.87 ccw(c1654.33,-320.87) 1656.83,-320.81 ; 1656.83,-320.87 cw(c1575.59,-320.87) 1575.59,-402.11 -2203.94,-402.11 cw(c-2203.94,-320.87) -2285.18,-320.87 -2285.18,3458.66 cw(c-2203.94,3458.66) -2203.94,3539.9 1575.59,3539.9 cw(c1575.59,3458.66) 1656.83,3458.66 1656.83,-320.81 ; 1656.83,-320.87 1656.83,-320.81

## Text inside footprints (layer, text, board x,y; h text height)
A: Top Overlay "U+" at -957.02,2782.75 h100 r35; Top Overlay "U-" at -1698.78,2263.38 h100 r35; Top Overlay "M" at -1861.2,2152 h100 r35
B: Top Overlay "U+" at 224.08,2782.75 h100 r35; Top Overlay "U-" at -517.68,2263.38 h100 r35; Top Overlay "M" at -680.1,2152 h100 r35
C: Top Overlay "U+" at 1405.18,2782.75 h100 r35; Top Overlay "U-" at 663.42,2263.38 h100 r35; Top Overlay "M" at 501,2152 h100 r35
JP4: Top Overlay "10" at -1098.16,27.51 h40; Top Overlay "9" at -1098.16,-72.49 h40; Top Overlay "1" at -1960.16,-64.49 h40; Top Overlay "2" at -1970.16,35.51 h40